# Altium PCB PitchShifter-PCB.PcbDoc (part 2 of 2)
Units mm, origin at the board's own origin, x right, y up, seen from the top; angles counter-clockwise.
Board outline 358.8 x 340 mm, 2 copper layers (Top Layer, Bottom Layer); 248 components, 206 nets, 919 pads, 27 vias.
Unrouted connection lines stored in the file: 494.
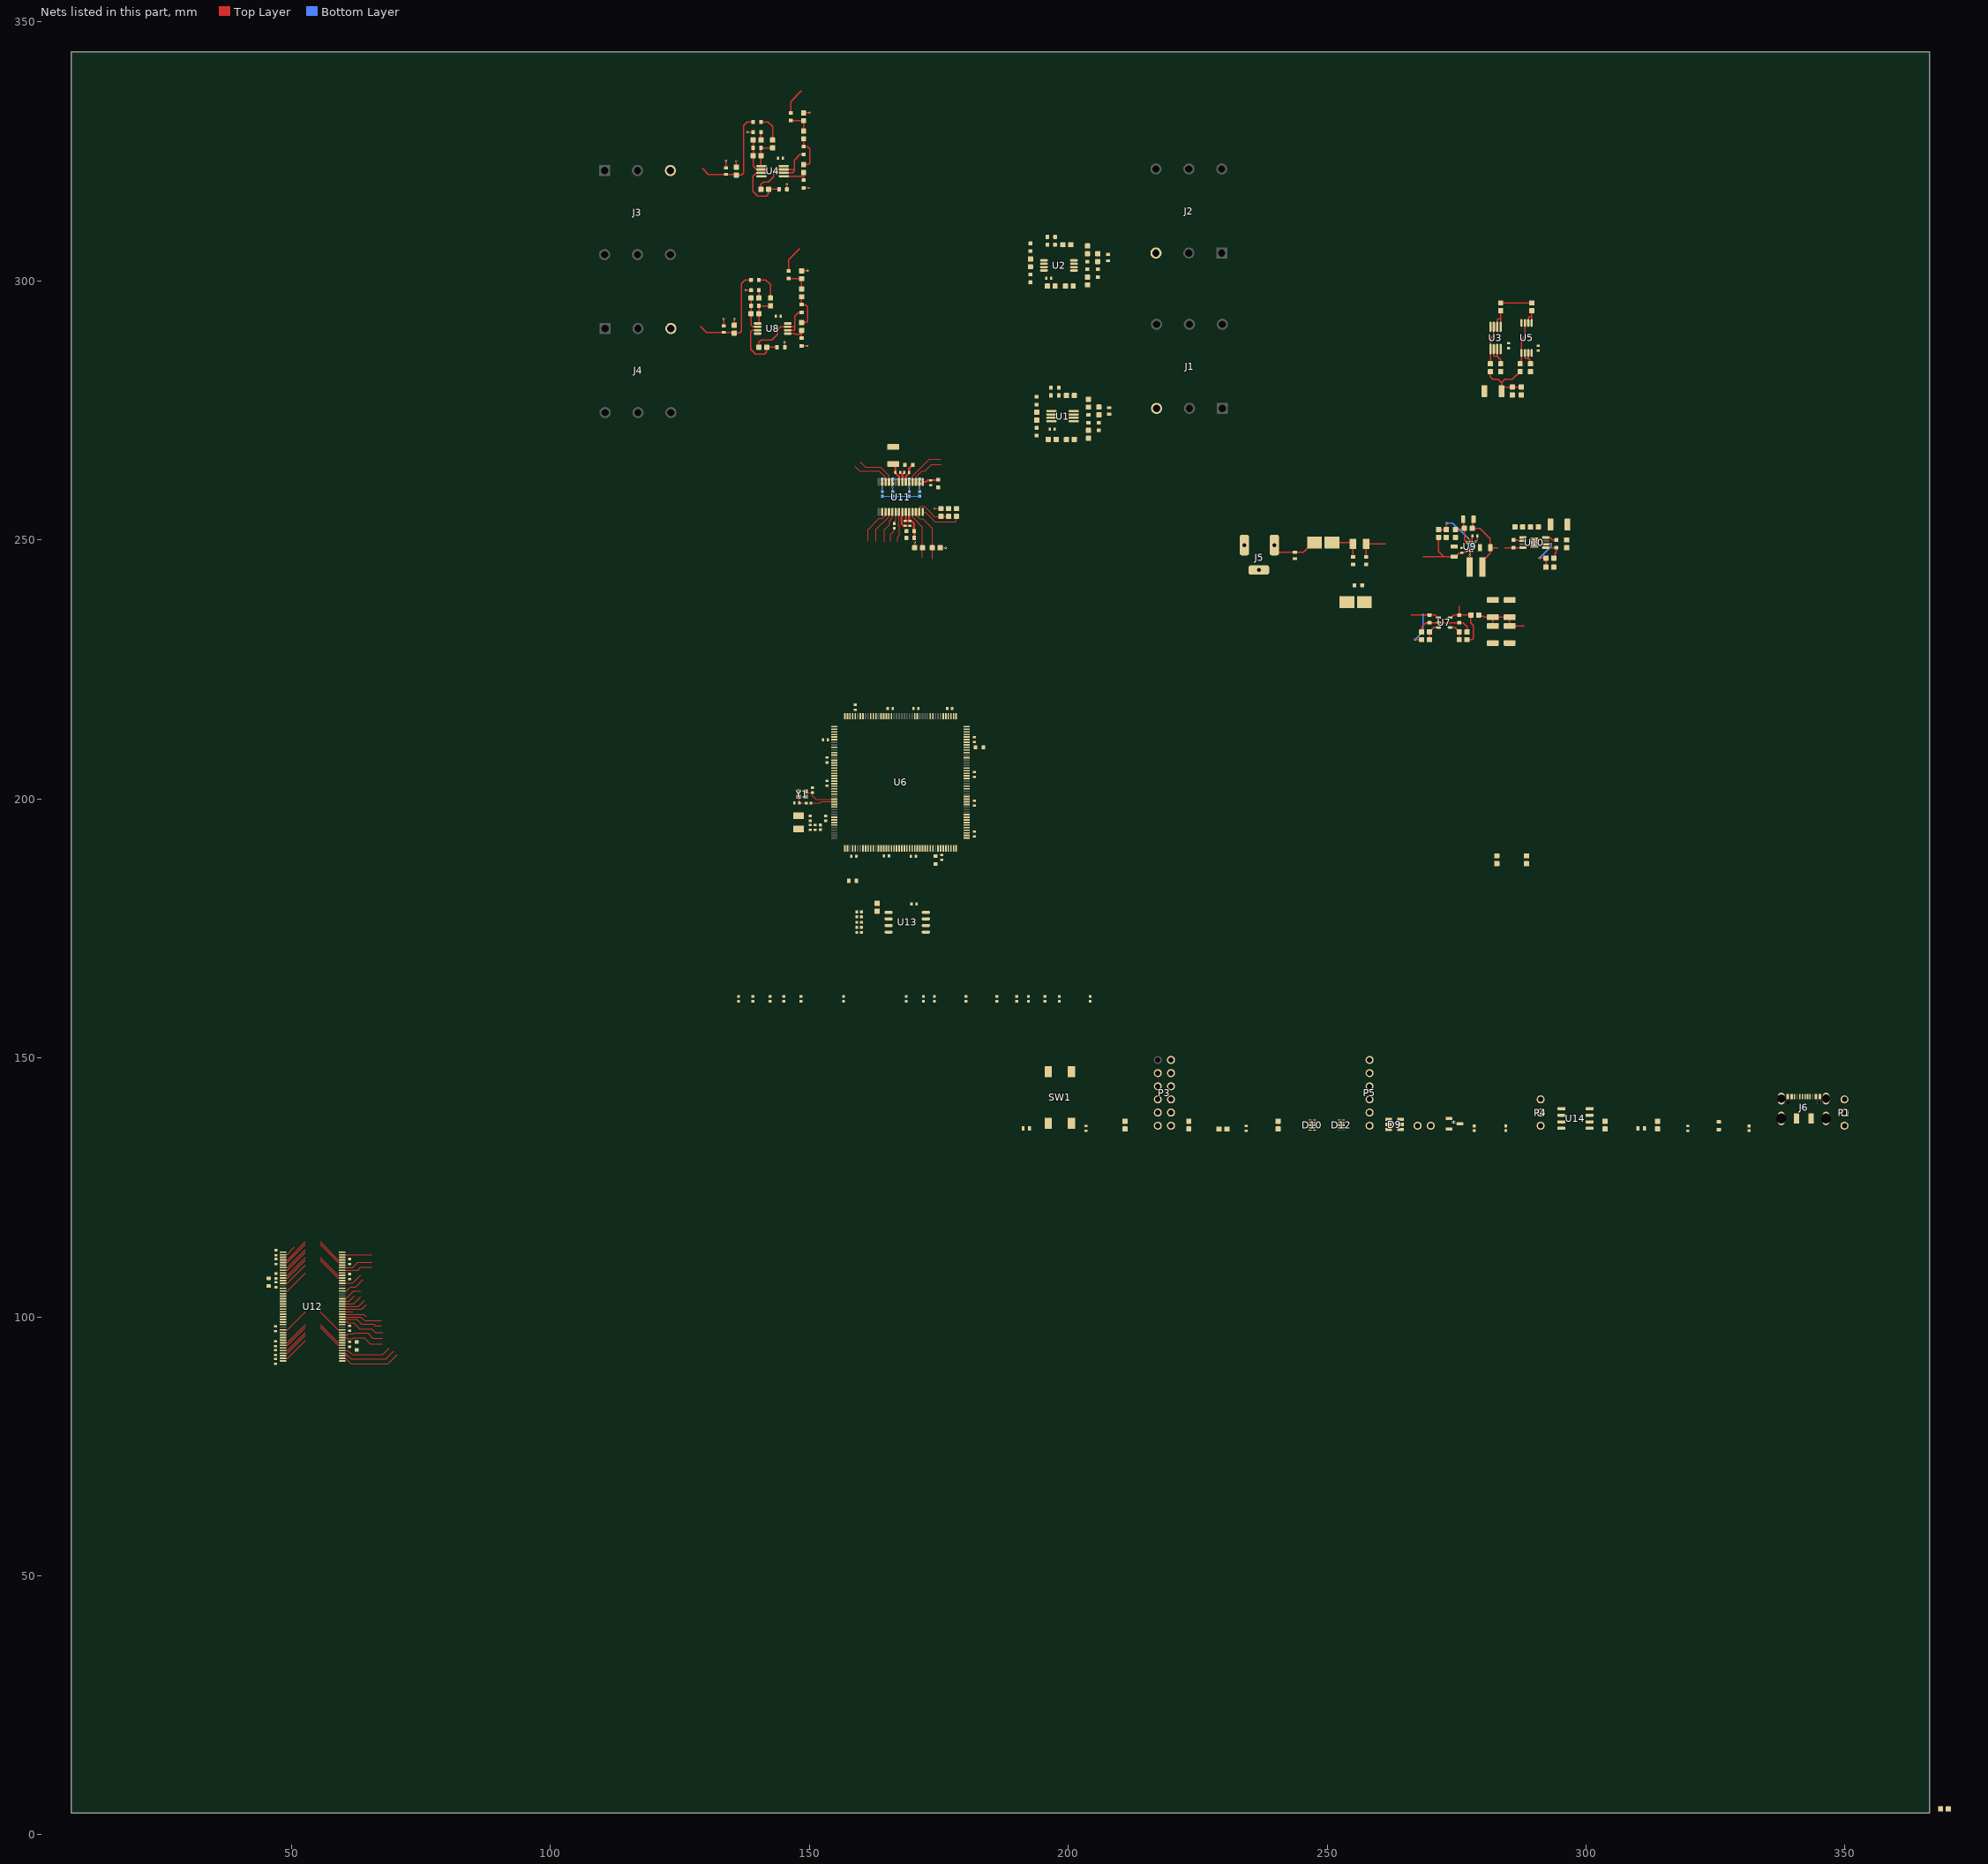
[diagram p2: the nets of this part, all layers, seen from the top]

## Part data
*: library part CMP-004-00034-1, "Automotive, dual, 3-pF, ±24-V, ±30-kV ESD protection diode for in-vehicle networks 3-SOT-23 -55 to 150", Case/Package=SOT-23, Manufacturer Lifecycle Status=ACTIVE, Height=1.22mm, Interface=CAN, Length=2.92mm, Lifecycle Status=Production, Pins=3, RoHS=Compliant, Thickness=1mm, Width=1.3mm
C1 C8 C15 C18 C26 C36 C37 C38 C39 C40 C41 C42 C43 C44 C45 C46 C47 C48 C49 C50 C53 C55 C56 C57 C67 C68 C69 C70 C71 C72 C73 C74 C75 C76 C77 C79 C82 C84 C95 C97 C99 C100 C103: library part CMP-001-00084-2, "MLCC 0402 50V / Samsung CL05B104KB54PNC"
C2 C6 C9 C13 C19 C24 C27 C32: library part CMP-001-00085-2, "MLCC 0603 50V / Samsung CL10C152JB8NNNC"
C3 C10 C17 C21 C22 C25 C29 C30 C33 C34 C35 C51 C52 C54 C66 C78 C86 C87 C92 C93 C98: library part CMP-001-00085-2, "Capacitor SMD Tantalum 0603 50V / Kyocera AVX F981C225MMA"
C4 C11: library part CMP-001-00085-2, "MLCC 0603 50V / TDK C1608C0G1H103JT000N"
C5 C7 C12 C14 C20 C23 C28 C31: library part CMP-001-00085-2, "MLCC 0603 50V / Samsung CL10C221JB8NNNC"
C16: library part CMP-001-00088-1, "MLCC 1210 10V / Samsung CL32A107MQVNNNE"
C58 C60 C63 C101: library part CMP-001-00085-2, "MLCC 0603"
C59 C61 C62 C64 C102: library part CMP-001-00084-2, "MLCC 0402"
C65 C88 C89 C90 C91 C94: library part CMP-001-00088-1, "1210, X5R:EIA, 100uF, DC6.3V, GRM32ER60J107ME20"
C80 C96: library part CMP-001-00084-2, "Capacitor, MLCC, 5.6pF, 50V, NPO, 5%, 0402, T=0,5mm"
C81 C83 C85: library part CMP-001-00086-2, "MLCC 0805"
D1 D2 D3 D4: library part CMP-12225-000013-1, "BORN 0603ESDA-05N Diode TVS / ESD Bidirectional 0603", Breakdown Voltage=6.4V, Clamping Voltage=10.2V, Manufacturer=STMicroelectronics, Manufacturer Part Number=ESDA7P60-1U1M, Max Junction Temp=+150°C, Package=1610, Peak Pulse Current=60A, Peak Pulse Power=700W, Reverse Standoff Voltage=5V, Temperature="-55°C to +150°C", Temperature Range Low=-55°C, Automotive=No, Category=Diode, ComponentLink2Description=Datasheet, ComponentLink2URL=http://www.st.com/content/ccc/resource/technical/document/datasheet/44/e9/26/44/42/ee/4f/e5/DM00139972.pdf/files/DM00139972.pdf/jcr:content/translations/en.DM00139972.pdf, Device Class L1="Circuit Protection", Device Class L2="TVS Diodes", Device Class L3=unset, Digikey Description="TVS DIODE 5V 11.6V 1610", Direction=Unidirectional, Height=0.65mm, Lead Free=Yes, Number Of Channels=1, Octopart=https://octopart.com/esda7p60-1u1m-stmicroelectronics-52112702, RoHS=TRUE, Standoff Height=0mm, Temperature Range High=+150°C
D5 D6: library part CMP-004-00006-2, "Nexperia BAT165AX / Rectifier Diode, Schottky, 1 Phase, 1 Element, 0.5A, 40V V(RRM), Silicon", Case/Package=SMB-2, Manufacturer=JCET, Package Description="2-Pin Surface Mount Device, Body 4.315 x 3.62 mm", Datasheet URL=http://wiki.seeedstudio.com/images/3/3f/0310130P1.pdf, Datasheet Version=May-13, Manufacturer URL=http://www.cj-elec.com/, Mounting Technology=SM, Package Reference=SMB-2, RoHS Compliant=Unknown
D7 D8: library part CMP-12225-000013-1, "Bourns CG0402MLU-12G  / ESD Protection Device, 25 V, 0402 [1005 Metric], 2 Pins, 12 V, 0.05 pF, ChipGuard MLU", Breakdown Voltage=6.4V, Clamping Voltage=10.2V, Manufacturer=STMicroelectronics, Manufacturer Part Number=ESDA7P60-1U1M, Max Junction Temp=+150°C, Package=1610, Peak Pulse Current=60A, Peak Pulse Power=700W, Reverse Standoff Voltage=5V, Temperature="-55°C to +150°C", Temperature Range Low=-55°C, Automotive=No, Category=Diode, ComponentLink2Description=Datasheet, ComponentLink2URL=http://www.st.com/content/ccc/resource/technical/document/datasheet/44/e9/26/44/42/ee/4f/e5/DM00139972.pdf/files/DM00139972.pdf/jcr:content/translations/en.DM00139972.pdf, Device Class L1="Circuit Protection", Device Class L2="TVS Diodes", Device Class L3=unset, Digikey Description="TVS DIODE 5V 11.6V 1610", Direction=Unidirectional, Height=0.65mm, Lead Free=Yes, Number Of Channels=1, Octopart=https://octopart.com/esda7p60-1u1m-stmicroelectronics-52112702, RoHS=TRUE, Standoff Height=0mm, Temperature Range High=+150°C
D9: library part CMP-004-00031-1, "STMicroelectronics Uni-Directional TVS Diode Array, 17V Vcl Max, SMD, SOT-23, 6V Vbr Min", Case/Package=SOT-23, Forward Voltage=1.1V, Max Operating Temperature=125°C, Min Operating Temperature=-40°C, Mounting Technology="Surface Mount", Pins=6
D10 D12: library part CMP-004-00032-3, "Tvs Diodes & Esd Suppressors; TPD4E02B04DQAR; Texas Instruments; 3.6 V; 8.8 V; 5.5 V; 6.4 V", Max Operating Temperature=125°C, Min Operating Temperature=-40°C, Mounting Technology="Surface Mount", Pins=10
D11: library part CMP-12225-000013-1, "Bourns CG0402MLU-3.3LG  / ESD Protection Device, 25 V, 0402 [1005 Metric], 2 Pins, 12 V, 0.05 pF, ChipGuard MLU", Breakdown Voltage=6.4V, Clamping Voltage=10.2V, Manufacturer=STMicroelectronics, Manufacturer Part Number=ESDA7P60-1U1M, Max Junction Temp=+150°C, Package=1610, Peak Pulse Current=60A, Peak Pulse Power=700W, Reverse Standoff Voltage=5V, Temperature="-55°C to +150°C", Temperature Range Low=-55°C, Automotive=No, Category=Diode, ComponentLink2Description=Datasheet, ComponentLink2URL=http://www.st.com/content/ccc/resource/technical/document/datasheet/44/e9/26/44/42/ee/4f/e5/DM00139972.pdf/files/DM00139972.pdf/jcr:content/translations/en.DM00139972.pdf, Device Class L1="Circuit Protection", Device Class L2="TVS Diodes", Device Class L3=unset, Digikey Description="TVS DIODE 5V 11.6V 1610", Direction=Unidirectional, Height=0.65mm, Lead Free=Yes, Number Of Channels=1, Octopart=https://octopart.com/esda7p60-1u1m-stmicroelectronics-52112702, RoHS=TRUE, Standoff Height=0mm, Temperature Range High=+150°C
FB1 FB2: library part CMP-06046-002300-1, "Ferrite Bead 3.6Ω @ 1MHz ±30% 2.55A 0.036Ω 1210 Embossed T/R"
J1 J2 J3 J4: library part CMP-78736-000004-1, "Conn 1/4\" Stereo Jack F 2 POS Solder ST Thru-Hole 6 Terminal 1 Port", Color=Black, Max Current Rating=3A, Max Operating Temperature=70°C, Min Operating Temperature=-25°C, Package Quantity=200, Voltage Rating=50V, Contact Material=Chrome, Contact Plating=Silver, Depth=18.2mm, Gender=Female, Housing Material=Polyamide, Mount="Through Hole", Number Of Contacts=2, Number of Pins=6, Number of Ports=1, Number of Terminals/Pins=6, Orientation=Horizontal, RoHS Compliant=Yes, Series=M, Termination="Through Hole", Weight=0.282192oz
J5: library part CMP-1502-00190-4, "DC Power Jack Connector WR-DC, Male, Right Angled, THT, 5 A, 24 V", Color=Black, Current Rating=5A, Flammability Rating="UL94 V-0", Insulation Resistance=100MΩ, Max Operating Temperature=85°C, Min Operating Temperature=-40°C, Operating Supply Voltage=24V, Voltage Rating=30V, Connector Type=Power, Contact Gender=Female, Contact Material="Gold, Tin", Contact Plating=Tin, Gender=Male, Height=11mm, Housing Material=Polyamide, Mount="Through Hole", Number Of Contacts=3, Packaging=Bulk, REACH SVHC=Unknown, RoHS=Compliant, Shielding=Unshielded, Termination="Through Hole"
J6: library part CMP-19038-000003-1, "CONN RCP USB2.0 TYP C 24P SMD RA"
L1: library part CMP-03913-148605656-1, "Power Inductor, 3.3UH, Shielded, 7.1A Rohs Compliant: Yes / Wurth 74439324033", ComponentLink1Description=Mauser, ComponentLink1URL=https://eu.mouser.com/en/ProductDetail/Wurth-Elektronik/74439324033?qs=HFfMDpzxxd18KH4wt4XmSg%3D%3D
P1 P4: library part CMP-002-00080-1, "Male Header, Pitch 2.54 mm, 1x3 Position, Height 8.636 mm, Tail Length 3.05 mm, -55 to 105 degC, RoHS, Bulk", Case/Package=2340-6111TG, Colour=Black, Current Rating=3A, Manufacturer=3M, Max Operating Temperature=105°C, Min Operating Temperature=-55°C, Package Description="Male Header, Pitch 2.54 mm, 1 x 40 Position, Height 8.636 mm, Tail Length 3.05 mm", Package Quantity=200, Connector Type=Header, Contact Finish=Gold, Contact Material=Copper, Contact Plating=Gold, Datasheet URL=https://datasheet.ciiva.com/5161/ts0766-242217-5161112.pdf, Datasheet Version=Aug-08, Gender=Male, Lead Pitch=0.1inch, Manufacturer URL=http://www.3m.com/, Max Current Rating=3A, Mounting Technology=TH, Package Reference=2340-6111TG, Packaging=Bulk, Pins=40, RoHS Compliant=True, Rows=1
P2: library part CMP-002-00078-1, "Male Header, Pitch 2.54 mm, 2x 1 Position, Height 8.636 mm, Tail Length 3.05 mm, -55 to 105 degC, RoHS, Bulk", Case/Package=2340-6111TG, Colour=Black, Current Rating=3A, Manufacturer=3M, Max Operating Temperature=105°C, Min Operating Temperature=-55°C, Package Description="Male Header, Pitch 2.54 mm, 1 x 40 Position, Height 8.636 mm, Tail Length 3.05 mm", Package Quantity=200, Connector Type=Header, Contact Finish=Gold, Contact Material=Copper, Contact Plating=Gold, Datasheet URL=https://datasheet.ciiva.com/5161/ts0766-242217-5161112.pdf, Datasheet Version=Aug-08, Gender=Male, Lead Pitch=0.1inch, Manufacturer URL=http://www.3m.com/, Max Current Rating=3A, Mounting Technology=TH, Package Reference=2340-6111TG, Packaging=Bulk, Pins=40, RoHS Compliant=True, Rows=1
P3: library part CMP-002-00077-1, "Male Header, Pitch 2.54 mm, 2x6 Position, Height 8.636 mm, Tail Length 3.05 mm, -55 to 105 degC, RoHS, Bulk", Case/Package=2340-6111TG, Colour=Black, Current Rating=3A, Manufacturer=3M, Max Operating Temperature=105°C, Min Operating Temperature=-55°C, Package Description="Male Header, Pitch 2.54 mm, 1 x 40 Position, Height 8.636 mm, Tail Length 3.05 mm", Package Quantity=200, Connector Type=Header, Contact Finish=Gold, Contact Material=Copper, Contact Plating=Gold, Datasheet URL=https://datasheet.ciiva.com/5161/ts0766-242217-5161112.pdf, Datasheet Version=Aug-08, Gender=Male, Lead Pitch=0.1inch, Manufacturer URL=http://www.3m.com/, Max Current Rating=3A, Mounting Technology=TH, Package Reference=2340-6111TG, Packaging=Bulk, Pins=40, RoHS Compliant=True, Rows=1
P5: library part CMP-002-00079-1, "Male Header, Pitch 2.54 mm, 1x6 Position, Height 8.636 mm, Tail Length 3.05 mm, -55 to 105 degC, RoHS, Bulk", Case/Package=2340-6111TG, Colour=Black, Current Rating=3A, Manufacturer=3M, Max Operating Temperature=105°C, Min Operating Temperature=-55°C, Package Description="Male Header, Pitch 2.54 mm, 1 x 40 Position, Height 8.636 mm, Tail Length 3.05 mm", Package Quantity=200, Connector Type=Header, Contact Finish=Gold, Contact Material=Copper, Contact Plating=Gold, Datasheet URL=https://datasheet.ciiva.com/5161/ts0766-242217-5161112.pdf, Datasheet Version=Aug-08, Gender=Male, Lead Pitch=0.1inch, Manufacturer URL=http://www.3m.com/, Max Current Rating=3A, Mounting Technology=TH, Package Reference=2340-6111TG, Packaging=Bulk, Pins=40, RoHS Compliant=True, Rows=1
R1 R3 R4 R5 R8 R10 R11 R12 R15 R16 R17 R18 R20 R21 R22 R24 R25 R26 R28 R29 R30 R32 R76 R77: library part CMP-009-00177-7, "Chip THIN FILM 0603 / Viking Tech ARG03FTC5101"
R2 R7 R9 R14 R19 R27: library part CMP-009-00177-7, "Chip THIN FILM 0603 / Viking Tech AR03FTC1004"
R6 R13 R23 R31: library part CMP-009-00177-7, "Chip THIN FILM 0603 / Resistor.Today HPCR0603F68R0K9"
R33 R34 R52 R53 R54 R55 R56 R57 R58: library part CMP-009-00177-7, "Chip 0603"
R35 R40 R41 R59 R60 R61 R62 R63 R64 R65 R66 R67 R68 R69 R70 R71 R75 R78 R79 R82 R83 R84 R85 R86 R87 R90 R91 R94 R95 R96 R97 R98 R99 R100 R101: library part CMP-009-00178-3, "Chip 0402 resistor"
R36 R37 R38 R39 R42 R43 R44 R45 R46 R47 R48 R49 R50 R51 R72 R73 R74 R80 R81 R88 R89 R92 R93 R?: library part CMP-009-00177-7, "Chip resistor 0603"
SW1: library part CMP-00030-00001-1, "Switch Tactile N.O. SPST Round Button Gull Wing 0.05A 12VDC >100000Cycles 1.6N SMD T/R", Case/Package=SMD/SMT, Max Operating Temperature=70°C, Min Operating Temperature=-20°C, Mounting Technology="Surface Mount"
U1 U3 U4: library part CMP-0187-00576-3, "None", Case/Package=MSOP, Input Bias Current=1pA, Input Offset Voltage (Vos)=4.5mV, Max Operating Temperature=125°C, Max Supply Voltage=6V, Min Operating Temperature=-40°C, Min Supply Voltage=1.8V, Nominal Supply Current=100uA, Operating Supply Voltage=5.5V, Output Current=23mA, Package Quantity=100, Power Supply Rejection Ratio (PSRR)=86dB, Voltage Gain=112dB, Amplifier Type="GENERAL PURPOSE", Bandwidth=1MHz, Common Mode Rejection Ratio=60dB, Gain Bandwidth Product=1MHz, Height=0.95mm, Input Offset Voltage-Max=4.5mV, Lead Free="Lead Free", Length=3mm, Mount="Surface Mount", Number of Amplifiers=2, Number Of Channels=2, Number of Circuits=2, Number of Elements=2, Number of Pins=8, Packaging=Rail/Tube, Radiation Hardening=No, REACH SVHC="No SVHC", RoHS Compliant=Yes, Slew Rate=0.6V/µs, Slew Rate-Nom=0.6V/µs, Supply Current=100uA, Technology=CMOS, Unity Gain Bandwidth Product=1MHz, Width=3mm
U2 U5 U8: library part CMP-014-00002-2, "Dual, 5.5-V, 10-MHz operational amplifier 8-TSSOP -40 to 125", Case/Package=TSSOP, Manufacturer Lifecycle Status=ACTIVE, Max Operating Temperature=125°C, Min Operating Temperature=-40°C, Bandwidth=10MHz, Height=1.2mm, Length=3mm, Lifecycle Status=Production, Number Of Channels=2, PartId=1, Pins=8, RoHS=Compliant, Slew Rate=6.5V/µs, Thickness=1mm, Width=4.4mm
U6: library part CMP-12105-000078-1, "IC MCU 32BIT 2MB FLASH 176LQFP", Ambient Temperature Range High=+85°C, Ambient Temperature Range Low=-40°C, Frequency=400MHz, Manufacturer=STMicroelectronics, Max Junction Temp=+125°C, Max Supply Voltage=3.6V, Min Supply Voltage=1.62V, Package=LQFP176-1T, Temperature="-40°C to +125°C", Automotive=No, Category=IC, ComponentLink2Description=Datasheet, ComponentLink2URL=https://www.st.com/resource/en/datasheet/stm32h743ii.pdf, Core Architecture="ARM Cortex-M7", Data Bus Width=32bits, Device Class L1="Integrated Circuits (ICs)", Device Class L2="Embedded Processors and Controllers", Device Class L3=Microcontrollers, Digikey Description="IC MCU 32BIT 2MB FLASH 176LQFP", Height=1.6mm, Interface=I2C,SPI,UART,USART,CAN,USB,LIN,IrDA,Ethernet,SMBus,Other, Ipc Land Pattern Name=QFP50P2600X2600X160-176, Lead Free=Yes, Manufacturer Part Number=STM32H743IIT6, Memory Size=2MBytes, Memory Type=FLASH, Mouser Description="MCU 32-Bit STM32 ARM Cortex M7 RISC 2MB Flash 1.8V/2.5V/3.3V 176-Pin LQFP Tray", Number Of A/D Converters=3, Number Of Adc Channels=36, Number Of Cores=1, Number Of Ethernet Channels=1, Number Of I2C Channels=4, Number Of I/Os=140, Number Of Pwm Channels=2, Number Of Spi Channels=6, Number Of Timers/Counters=20, Number Of Uart Channels=9, Number Of Usb Channels=2, Octopart=https://octopart.com/stm32h743iit6-stmicroelectronics-76372526, Ram Size=1MBytes, RoHS=TRUE, Standoff Height=0.05mm, Temperature Range High=+125°C, Temperature Range Low=-40°C
U7: library part CMP-07128-000004-1, "300 MA LOW IQ WIDE INPUT", Dropout Voltage=480mV, Manufacturer="On Semiconductor", Max Junction Temp=+125°C, Max Supply Voltage=24V, Min Supply Voltage=2.5V, Nominal Supply Current=50-300uA, Output Current=300mA, Output Voltage=1.2-5V, Package=419AE-01, Temperature="to +125°C", Accuracy Percentage=2%, Automotive=No, Category=IC, ComponentLink2Description=Datasheet, ComponentLink2URL=https://www.onsemi.com/pub/Collateral/NCP718-D.PDF, ComponentLink3Description=Mauser, ComponentLink3URL=https://eu.mouser.com/en/ProductDetail/onsemi/NCP718BSNADJT1G?qs=MLItCLRbWszq%252BMkbDp%2FijQ%3D%3D, Device Class L1="Integrated Circuits (ICs)", Device Class L2="Power Management ICs", Device Class L3="Voltage Regulators - Linear", Digikey Description="300 MA LOW IQ WIDE INPUT", Height=1mm, Lead Free=Yes, Manufacturer Part Number=NCP718BSNADJT1G, Mouser Description="LDO Regulator, 300 mA, Wide Vin, Ultra-Low Iq Adjustable, Non-Active Discharge, TSOT23-5", Number Of Outputs=1, Octopart=https://octopart.com/ncp718bsnadjt1g-on+semiconductor-87658781, Output Type=AdjustableProgrammable, RoHS=TRUE, Standoff Height=0.01mm, Temperature Range High=+125°C
U9: library part CMP-019-00067-2, "4.2V to 17V input voltage, 2A, 1.2MHz synchronous buck converter in SOT563 with Eco-mode 6-SOT-5X3 -40 to 125", Manufacturer Lifecycle Status=ACTIVE, Height=600µm, Length=1.6mm, Lifecycle Status=Production, Pins=6, RoHS=Compliant, Thickness=550µm, Topology=Buck, Width=1.2mm
U10: library part CMP-019-00068-2, "Adjustable- and fixed-output, 1-A, 16-V, positive-voltage low-dropout (LDO) linear regulator", Manufacturer Lifecycle Status=ACTIVE, Output Voltage=1.8V, Height=1.1mm, Length=3mm, Lifecycle Status=Production, Number Of Channels=1, Pins=8, RoHS=Compliant, Thickness=1.02mm, Width=3mm
U11: library part CMP-015-00011-3, "PCM Audio Codec, 2ADC/2DAC Ch, Automotive, 28-Pin TSSOP Tube", Case/Package=TSSOP, Max Operating Temperature=85°C, Max Supply Current=53mA, Max Supply Voltage=5.25V, Min Operating Temperature=-40°C, Min Supply Voltage=4.75V, Nominal Supply Current=45mA, Temperature Grade=Industrial, Contact Plating=Tin, Height - Seated (Max)=1.2mm, Interface="I2C, SPI", Introduction Date=2003-01-21, Length=9.7mm, Lifecycle Status=Obsolete, LTB Date=2021-04-19, LTD Date=2021-04-19, Mounting Technology="Surface Mount", Number Of A/D Converters=2, Number of Bits=24, Number Of Channels=2, Number of Circuits=1, Number of D/A Converters=2, Number of Terminals=28, Pins=28, REACH SVHC=Unaffected, Resolution=3B, RoHS=Compliant, Sampling Rate=192ksps, Signal to Noise Ratio (SNR)=114dB, Terminal Pitch=650µm, Termination=SMD/SMT, Type="General Purpose", Width=4.4mm
U12: library part CMP-019-00064-5, "128M, 3.3V, Sdram, 4Mx32, 166Mhz, 86 Pin;", Max Operating Temperature=70°C, Max Supply Voltage=3.6V, Min Operating Temperature=0°C, Min Supply Voltage=3V, Nominal Supply Voltage (DC)=3.3V, Temperature Grade=Commercial, Access Time=5.4ns, China RoHS=Compliant, Country of Origin="Mainland China, Taiwan", Export Control Classification Number (ECCN) Code=EAR99, Harmonized Tariff Schedule (HTS) Code=8542.32.00.02, Height - Seated (Max)=1.2mm, Introduction Date=2017-05-09, Length=22.22mm, Lifecycle Status=Production, Number of Circuits=1, Number of Ports=1, Number of Terminals=86, REACH SVHC=Unaffected, RoHS=Compliant, Terminal Pitch=500µm, Width=10.16mm
U13: library part CMP-019-00065-3, "NOR Flash Serial (SPI, Dual SPI, Quad SPI) 1.8V 128M-bit 16M x 8 8-Pin SOIC Bulk", Case/Package=SOP, Max Operating Temperature=85°C, Max Supply Current=20mA, Max Supply Voltage=1.95V, Min Operating Temperature=-40°C, Min Supply Voltage=1.7V, Nominal Supply Voltage (DC)=1.8V, Temperature Grade=Industrial, China RoHS=Compliant, Country of Origin=Taiwan, Export Control Classification Number (ECCN) Code=EAR99, Harmonized Tariff Schedule (HTS) Code=8542.32.00.51, Height - Seated (Max)=2.16mm, Introduction Date=2019-05-23, Length=5.28mm, Lifecycle Status=Production, Memory Format=FLASH, Number of Circuits=1, Number of Terminals=8, REACH SVHC=Unaffected, RoHS=Compliant, Schedule B=8542320070, Terminal Pitch=1.27mm, Width=5.28mm
U14: library part CMP-015-00010-2, "Automotive 3.3V CAN flexible-data-rate (FD) transceiver with shutdown and standby mode 8-SOIC -40 to 150", Case/Package=SOIC, Manufacturer Lifecycle Status=ACTIVE, Height=1.75mm, Length=4.9mm, Lifecycle Status=Production, Pins=8, RoHS=Compliant, Thickness=1.58mm, Width=3.91mm
Y1: library part CMP-200220-000017-1, "NX2016SA 25MHz / Crystal 25MHz, 6pF, +-20ppm, 80ohms max, SMD", Case/Package=SMD/SMT, ESR (Equivalent Series Resistance)=60R, Frequency=32MHz, Load Capacitance=8pF, Max Operating Temperature=125°C, Min Operating Temperature=-40°C, Ratings=AEC-Q200, Mount="Surface Mount", Packaging="Tape and Reel"

## Via types
v1: diameter 0.4, hole 0.2, Top Layer to Bottom Layer, 27 vias

## Nets (pads, with @x,y where several pads share a name; then routed paths per layer and width w, separated by ;. In a path a pad name is that pad's centre, name@x,y a point inside that pad or via, vN(x,y) a via of type N, cw(c..) or ccw(c..) an arc to the next point about the centre after c; other vN are vias at no path point)
+3V3: C35.1 C36.2 C37.2 C38.2 C39.2 C40.2 C41.2 C42.2 C43.1 C44.1 C45.1 C46.1 C47.1 C48.1 C55.1 C56.1 C57.1 C60.1 C61.1 C66.1 C67.1 C68.1 C69.1 C70.1 C71.1 C72.1 C73.1 C74.1 C75.1 C76.1 C77.1 C78.1 C79.1 C93.1 C97.1 C98.1 C101.1 C102.1 C103.1 D11.1 FB2.1 P3.8 P3.9 R34.2 R47.1 R49.2 R72.2 R73.2 R88.1 U6.15 U6.23 U6.36 U6.49 U6.62 U6.72 U6.82 U6.91 U6.103 U6.114 U6.127 U6.136 U6.149 U6.159 U6.172 U10.1 U11.9 U11.10 U12.1 U12.3 U12.9 U12.15 U12.29 U12.35 U12.41 U12.43 U12.49 U12.55 U12.75 U12.81 U13.8 U14.3 | length 14.6
  Top Layer w0.15: R72.2@170.345,248.5 v1(170.345,249.545) ; R73.2@175.255,248.5 v1(176.3,248.5)
  Top Layer w0.254: U10.1@292.2,248.525 292.213,248.513 294.238,248.513 C93.1@294.25,248.5 294.25,247.636 294,247.386 294,246.745 R49.2@293.755,246.5
  Top Layer w0.4: U11.9@168.625,255.4 168.625,253.725 168.575,253.675 C102.1@168.5,253.675 169.725,253.675 170.2,253.2 170.2,251.75 C60.1@170.25,251.7 C101.1@170.25,250.4 ; U11.10@169.275,255.4 169.275,253.725 C61.1@169.325,253.675
+3V3A: C94.2 R47.2
+4V: C83.1 C85.1 C92.1 L1.2 R37.1 R48.1 U10.8 | length 17.5
  Top Layer w0.254: C85.1@278.25,254 278.128,253.878 278.128,252.373 R37.1@278.005,252.25 279.5,252.25 281.5,250.25 C83.1@281.5,248.5 ; L1.2@279.975,244.75 279.975,246.05 280.448,246.523 280.604,246.523 281.5,247.419 C83.1@281.5,248.5 ; 283,248.5 C83.1@281.5,248.5 ; 284.25,248.5 C92.1@286,248.5 286.012,248.513 287.787,248.513 U10.8@287.8,248.525
+5V: C87.1 R42.1 R43.1 U7.5 | length 12
  Top Layer w0.254: U7.5@273.731,235 273.958,235 274.458,235.5 C87.1@275.5,235.5 ; 275.5,237.25 C87.1@275.5,235.5 ; R43.1@277.005,230.75 278,230.75 278.25,231 278.25,233.5 277.745,234.005 R42.1@277.745,235.5 C87.1@275.5,235.5
+5VA: C1.1 C8.1 C15.1 C18.1 C26.1 C58.1 C59.1 C88.2 C89.2 C90.2 C91.2 C95.1 R15.2 R42.2 R74.2 U1.8 U2.8 U3.8 U4.8 U5.8 U8.8 U11.20 | length 17.5
  Top Layer w0.15: v1(174.155,256.055) R74.2@175.4,256.055
  Top Layer w0.254: R42.2@279.255,235.5 279.48,235.275 280.141,235.275 280.316,235.1 C90.2@282,235.1 ; C88.2@282,233.4 C90.2@282,235.1 ; 288,233.5 287.9,233.4 C89.2@285.25,233.4 C91.2@285.25,235.1 C90.2@282,235.1
  Top Layer w0.4: U11.20@168.625,261.2 168.65,261.225 168.65,262.3 169.275,262.925 C59.1@169.275,263 169.275,263.825 169.75,264.3 169.8,264.3 169.95,264.45 C58.1@169.95,264.5
+V_USB: D5.1 D8.1 D9.5 J6.A4/B9 J6.B4/A9
+VBL: C17.1 R1.1 R2.2 R19.2 R33.2 R52.1 R54.1 | length 8.2
  Top Layer w0.254: v1(138.1,328.7) C17.1@139.15,328.7 ; R19.2@148.9,332.455 v1(150.045,332.455) ; R52.1@283.5,295.755 R54.1@289.5,295.755
+VBR: C25.1 R8.1 R9.2 R27.2 R56.1 R57.1 R58.2 | length 2.2
  Top Layer w0.254: v1(137.7,298.2) C25.1@138.75,298.2 ; R27.2@148.5,301.955 v1(149.645,301.955)
+VBUS: C54.1 D5.2 R80.1 R?.2
+VCC: D6.1 D7.1 J5.1 | length 9.5
  Top Layer w0.254: J5.1@239.8,249 239.8,248.373 240.548,247.625 D7.1@243.75,247.625 245.4,247.625 247.275,249.5 D6.1@247.575,249.5
+VCC_FILT: C34.1 C81.2 C82.1 C86.1 FB1.2 R36.1 R45.1 R?.1 U7.1 U9.1 | length 31.1
  Top Layer w0.254: C34.1@257.5,246.75 257.5,249.225 FB1.2@257.525,249.25 261.25,249.25 ; 266.25,235.5 v1(268.5,235.5) C86.1@269.75,235.5 270.773,235.5 271.273,235 U7.1@271.5,235 ; v1(267,230.75) R45.1@268.245,230.75 ; 268.5,246.75 272.5,246.75 ; R36.1@271.5,250.495 271.5,247.75 272.5,246.75 ; 276.75,247.75 276.623,247.623 276.098,247.623 C82.1@276,247.525 275.902,247.427 275.477,247.427 274.8,246.75 C81.2@274.5,246.75 272.5,246.75
  Bottom Layer w0.254: v1(267,230.75) 268.5,232.25 v1(268.5,235.5)
+VCC_RP: C33.1 D6.2 FB1.1 | length 6.7
  Top Layer w0.254: D6.2@250.925,249.5 254.725,249.5 FB1.1@254.975,249.25 255,249.225 C33.1@255,246.75
AUDIOL_IN: D1.1 J1.3 R6.1
AUDIOL_OUT: C22.2 D3.1 J3.3 R24.2 | length 19.9
  Top Layer w0.254: 129.4,321.7 130.525,320.575 D3.1@133.9,320.575 133.965,320.51 135.835,320.51 R24.2@135.9,320.445 136.945,320.445 137.3,320.8 137.3,330 138,330.7 C22.2@139.15,330.7
AUDIOR_IN: D2.1 J2.3 R13.1
AUDIOR_OUT: C30.2 D4.1 J4.3 R32.2 | length 19.9
  Top Layer w0.254: 129,291.2 130.125,290.075 D4.1@133.5,290.075 133.565,290.01 135.435,290.01 R32.2@135.5,289.945 136.545,289.945 136.9,290.3 136.9,299.5 137.6,300.2 C30.2@138.75,300.2
BOOT0: D12.4 D12.7 P3.7 R89.1 U6.166
BUCK_BST: C84.2 U9.4 | length 1.3
  Top Layer w0.254: U9.4@278,249.49 278.009,249.499 278.009,250.734 C84.2@278.025,250.75
BUCK_EN: R36.2 R38.1 U9.5 | length 9.1
  Top Layer w0.254: R36.2@271.5,252.005 R38.1@273,252.005 v1(273,253.25) ; v1(277.25,250.25) 277.5,250 U9.5@277.5,249.49
  Bottom Layer w0.254: v1(273,253.25) 274.25,253.25 v1(277.25,250.25)
BUCK_FB: C85.2 R37.2 R39.1 U9.6 | length 6.7
  Top Layer w0.254: R39.1@274.75,252.005 274.873,252.127 276.373,252.127 R37.2@276.495,252.25 ; C85.2@276.25,254 276.373,253.877 276.373,252.373 R37.2@276.495,252.25 ; U9.6@277,249.49 276.495,249.995 R37.2@276.495,252.25
BUCK_SW: C84.1 L1.1 U9.2 | length 7.6
  Top Layer w0.254: U9.2@277.5,248.01 v1(277.5,247) 277.5,244.775 L1.1@277.525,244.75 ; v1(278.75,249.75) 278.975,249.975 C84.1@278.975,250.75
  Bottom Layer w0.254: v1(277.5,247) 277.5,248.5 v1(278.75,249.75)
CAN_H: *.1 R79.2 U14.7
CAN_L: *.2 P2.1 U14.6
CAN_RX: R78.2 U14.4
CAN_SHDN: R67.1 U14.5
CAN_STB: U14.8
CAN_TX: R65.1 R69.1 U14.1
CODEC_ADDR: R74.1 R93.2 U11.13 | length 7.3
  Top Layer w0.15: U11.13@171.225,255.4 171.225,256.237 171.488,256.5 172.2,256.5 173.1,255.6 174.155,254.545 175.3,254.545 R74.1@175.4,254.545 176,254.545 R93.2@176.8,254.545
CODEC_AINA-: R94.1 R101.1 U11.16 | length 2.6
  Top Layer w0.15: v1@171.237,260.113 U11.16@171.237,261.188
  Bottom Layer w0.15: R101.1@171.3,259.35 171.275,259.375 171.275,260.075 v1(171.25,260.1) 171.275,260.125 171.275,260.825 R94.1@171.3,260.85
CODEC_AINB-: R95.1 R100.1 U11.19 | length 2.6
  Top Layer w0.15: U11.19@169.275,261.2 169.287,261.188 169.287,260.113 v1(169.3,260.1)
  Bottom Layer w0.15: R100.1@169.3,259.35 v1(169.3,260.1) R95.1@169.3,260.85
CODEC_AOUTA-: R96.1 R99.1 U11.24 | length 2.6
  Top Layer w0.15: v1@166.037,260.113 U11.24@166.037,261.188
  Bottom Layer w0.15: R99.1@166.1,259.35 166.075,259.375 166.075,260.075 v1(166.05,260.1) 166.075,260.125 166.075,260.825 R96.1@166.1,260.85
CODEC_AOUTB-: R97.1 R98.1 U11.27 | length 2.6
  Top Layer w0.15: v1@164.088,260.113 U11.27@164.088,261.188
  Bottom Layer w0.15: R98.1@164.1,259.35 v1(164.1,260.1) R97.1@164.1,260.85
CODEC_DOUT: R60.2 U11.6 | length 2.4
  Top Layer w0.15: R60.2@166.4,253.15 166.429,253.179 166.429,253.562 166.675,253.808 U11.6@166.675,255.4
CODEC_FILT+: C64.1 C65.2 U11.22 | length 4
  Top Layer w0.4: C65.2@166.2,264.65 166.275,264.65 166.625,264.3 C64.1@166.625,263 166.625,262.925 167.3,262.25 167.3,261.225 U11.22@167.325,261.2
CODEC_IN_L: C3.1 U11.17 | length 6.9
  Top Layer w0.15: U11.17@170.575,261.2 170.587,261.212 170.587,262.2 171.687,263.3 172.3,263.3 173.6,264.6 175.5,264.6
CODEC_IN_R: C10.1 U11.18 | length 7.9
  Top Layer w0.15: U11.18@169.925,261.2 169.925,262.371 173.154,265.6 175.294,265.6
CODEC_OUT_L: C21.2 U11.25 | length 13
  Top Layer w0.15: 159.8,265.1 160.8,264.1 163.7,264.1 165.375,262.425 U11.25@165.375,261.2
  Top Layer w0.254: C21.2@146.4,332.45 146.4,334.6 148.5,336.7
CODEC_OUT_R: C29.2 U11.26 | length 12.8
  Top Layer w0.15: 158.8,264.2 159.7,263.3 163.5,263.3 164.629,262.171 164.629,261.296 U11.26@164.725,261.2
  Top Layer w0.254: C29.2@146,301.95 146,304.1 148.1,306.2
CODEC_RST: R59.2 R92.2 U11.14 | length 8.8
  Top Layer w0.15: U11.14@171.875,254.875 U11.14@171.875,255.4 172.4,255.4 174.3,253.5 178.2,253.5 178.4,253.7 R92.2@178.4,254.545
FDCAN2_RX: R78.1 U6.92
FDCAN2_SHDN: R67.2 U6.94
FDCAN2_STB: R69.2 U6.95
FDCAN2_TX: R65.2 U6.93
GND: *.3 C1.2 C5.1 C6.2 C7.1 C8.2 C12.1 C13.2 C14.1 C15.2 C16.2 C18.2 C23.1 C24.1 C26.2 C31.1 C32.1 C33.2 C34.2 C35.2 C36.1 C37.1 C38.1 C39.1 C40.1 C41.1 C42.1 C43.2 C44.2 C45.2 C46.2 C47.2 C48.2 C49.2 C50.2 C51.2 C52.2 C53.2 C54.2 C55.2 C56.2 C57.2 C58.2 C59.2 C60.2 C61.2 C62.2 C63.2 C64.2 C65.1 C66.2 C67.2 C68.2 C69.2 C70.2 C71.2 C72.2 C73.2 C74.2 C75.2 C76.2 C77.2 C78.2 C79.2 C80.2 C81.1 C82.2 C83.2 C86.2 C87.2 C88.1 C89.1 C90.1 C91.1 C92.2 C93.2 C94.1 C95.2 C96.1 C97.2 C98.2 C99.2 C100.2 C101.2 C102.2 C103.2 D1.2 D2.2 D3.2 D4.2 D7.2 D8.2 D9.2 D10.3 D10.8 D11.2 D12.3 D12.8 J5.2 J5.3 J6.1 J6.2 J6.3 J6.4 J6.5 J6.6 J6.A1/B12 J6.A12/B1 P1.2 P3.10 P3.11 P4.2 P5.6 R7.1 R14.1 R16.1 R24.1 R32.1 R38.2 R39.2 R44.2 R46.2 R50.2 R51.1 R76.2 R77.2 R81.2 R89.2 R92.1 R93.1 R98.2 R99.2 R100.2 R101.2 SW1.3 SW1.4 U1.4 U2.4 U3.4 U4.4 U5.4 U6.14 U6.22 U6.37 U6.48 U6.61 U6.71 U6.90 U6.102 U6.113 U6.126 U6.135 U6.148 U6.158 U7.2 U8.4 U9.3 U10.4 U10.6 U10.9 U11.2 U11.8 U11.21 U12.6 U12.12 U12.32 U12.38 U12.44 U12.46 U12.52 U12.58 U12.72 U12.78 U12.84 U12.86 U13.4 U14.2 Y1.2 Y1.4 | length 38.7
  Top Layer w0.254: D4.2@133.5,291.325 v1(133.5,292.7) ; D3.2@133.9,321.825 v1(133.9,323.2) ; R32.1@135.5,291.455 v1(135.5,292.7) ; R24.1@135.9,321.955 v1(135.9,323.2) ; C31.1@145.25,287.2 v1(145.25,288.15) ; C23.1@145.65,317.7 v1(145.65,318.65) ; C32.1@148.5,287.45 v1(149.55,287.45) ; C24.1@148.9,317.95 v1(149.95,317.95) ; R46.2@268.245,232.25 268.245,233.245 269,234 C86.2@269.75,234 269.775,234.025 271.475,234.025 U7.2@271.5,234.05 271.525,234.025 275.475,234.025 C87.2@275.5,234 275.531,233.969 276.281,233.969 277.005,233.245 R44.2@277.005,232.25 ; C92.2@286,250 286.781,250 286.912,249.869 287.756,249.869 U10.6@287.8,249.825 ; U10.4@292.2,250.475 292.244,250.431 293.038,250.431 293.469,250 C93.2@294.25,250
  Top Layer w0.4: C64.2@167.575,263 167.575,262.925 167.6,262.9 167.625,262.9 167.975,262.55 ; U11.8@167.975,255.4 167.95,255.375 167.95,254.601 167.806,254.457 167.806,253.077 168.133,252.75 168.475,252.75 C102.2@168.5,252.725 C61.2@169.4,252.725 ; U11.21@167.975,261.2 167.975,262.55 ; C59.2@168.325,263 168.325,262.925 167.975,262.575 167.975,262.55
  Bottom Layer w0.15: R98.2@164.1,258.45 R99.2@166.1,258.45 R100.2@169.3,258.45 R101.2@171.3,258.45
I2C1_SCL: R61.1 R72.1 U11.11 | length 9.7
  Top Layer w0.15: U11.11@169.925,255.4 169.925,254.439 171.855,252.509 R72.1@171.855,248.5 171.855,246.5
I2C1_SDA: R63.1 R73.1 U11.12 | length 10.7
  Top Layer w0.15: U11.12@170.575,255.4 170.575,254.865 171.34,254.1 171.9,254.1 173.745,252.255 R73.1@173.745,248.5 173.745,246.355
I2C2_SCL: P4.1 R90.1
I2C2_SDA: P4.3 R91.1
INL_ADC_CAP: C3.2 C5.2 R3.1
INL_BUF: C4.1 R2.1 U1.3
INL_BUF_OUT: R4.2 U1.1 U1.2
INL_FILT_OUT: C2.1 R3.2 U1.6 U1.7
INL_FILT_RC1: C2.2 R1.2 R4.1 R5.1
INL_FILT_RC2: C6.1 R5.2 U1.5
INL_RF: C4.2 C7.2 R6.2 R7.2
INR_ADC_CAP: C10.2 C12.2 R10.1
INR_BUF: C11.1 R9.1 U2.3
INR_FILT_OUT: C9.1 R10.2 U2.6 U2.7
INR_FILT_RC1: C9.2 R8.2 R11.1 R12.1
INR_FILT_RC2: C13.1 R12.2 U2.5
INR_RF: C11.2 C14.2 R13.2 R14.2
JTRST: D12.2 D12.9 P3.6 U6.162
LDO3V3_EN: R48.2 R50.1 U10.5
LDO3V3_SNS: R49.1 R51.2 U10.2 | length 7.8
  Top Layer w0.254: v1(291,246.5) R49.1@292.245,246.5 R51.2@292.245,244.75 ; U10.2@292.2,249.175 292.244,249.219 292.992,249.219 293.023,249.25 v1(293.25,249.25)
  Bottom Layer w0.254: v1(291,246.5) 293.25,248.75 v1(293.25,249.25)
LDO5V_EN: R45.2 R46.1 U7.3 | length 3.6
  Top Layer w0.254: R45.2@269.755,230.75 R46.1@269.755,232.25 270.605,233.1 U7.3@271.5,233.1
LDO5V_FB: R43.2 R44.1 U7.4 | length 3.6
  Top Layer w0.254: U7.4@273.731,233.1 274.645,233.1 R44.1@275.495,232.25 R43.2@275.495,230.75
MCU_VBAT: C53.1 U6.6
MCU_VCAP: C51.1 C52.1 U6.81 U6.125
MCU_VDDA: C49.1 C50.1 FB2.2 R87.2 U6.39
NetC16_1: C16.1 R15.1 R16.2 R53.2 R55.2 | length 13.7
  Top Layer w0.254: R53.2@281.5,282.495 281.5,281.5 282,281 283,281 283.65,280.35 ; C16.1@283.65,278.75 C16.1@283.65,279.083 ; R55.2@287.25,282.495 285.755,281 284.3,281 283.65,280.35 ; R15.1@287.5,279.505 R16.2@285.75,279.505 284.072,279.505 C16.1@283.65,279.083 ; C16.1@283.65,279.083 283.65,280.35
NetC17_2: C17.2 R17.2 | length 1.5
  Top Layer w0.254: C17.2@140.65,328.7 140.653,328.697 140.653,327.203 R17.2@140.655,327.2
NetC25_2: C25.2 R25.2 | length 1.5
  Top Layer w0.254: C25.2@140.25,298.2 140.252,298.197 140.252,296.703 R25.2@140.255,296.7
NetC28_2: C28.2 R26.1 R31.1 U8.1 | length 5.8
  Top Layer w0.254: C28.2@140.25,295.2 C28.2@140.252,295.197 ; U8.1@140.35,291.675 140.346,291.675 140.255,291.766 R26.1@140.255,293.7 140.252,293.703 C28.2@140.252,295.197 ; R31.1@142.5,295.195 142.498,295.197 C28.2@140.252,295.197
NetJ6_A5: J6.A5 R76.1
NetJ6_B5: J6.B5 R77.1
NetP2_2: P2.2 R79.1
NetR11_2: R11.2 U2.1 U2.2
NetR87_1: R87.1 U6.38
NRST: C100.1 D10.5 D10.6 P3.4 R88.2 SW1.1 SW1.2 U6.31
OSC_IN: C80.1 U6.29 Y1.3 | length 6.6
  Top Layer w0.15: Y1.3@149.275,201.475 149.525,201.225 C80.1@150.6,201.225 ; C80.1@150.675,201.225 C80.1@150.6,201.225 ; U6.29@154.85,199.95 151.25,199.95 150.6,200.6 C80.1@150.6,201.225
OSC_OUT: R62.1 U6.30 | length 4.7
  Top Layer w0.15: R62.1@150.3,199.2 152.15,199.2 152.4,199.45 U6.30@154.85,199.45
OSC_OUT_RES: C96.2 R62.2 Y1.1 | length 2.6
  Top Layer w0.15: Y1.1@147.925,200.425 148.075,200.275 C96.2@148.075,199.2 R62.2@149.4,199.2
OUTL_BIAS: C21.1 R19.1 R21.1 | length 4.5
  Top Layer w0.254: C21.1@146.4,330.95 146.402,330.948 148.898,330.948 R19.1@148.9,330.945 R21.1@148.9,328.955
OUTL_BUF_FB: C20.1 R17.1 R18.2 U4.2 | length 6.9
  Top Layer w0.254: R17.1@139.145,327.2 139.147,327.198 139.147,325.703 C20.1@139.15,325.7 139.147,325.698 139.147,324.203 R18.2@139.145,324.2 139.145,322.148 139.73,321.563 140.712,321.563 U4.2@140.75,321.525
OUTL_BUF_IN: C23.2 R20.2 U4.3 | length 11.3
  Top Layer w0.254: U4.3@140.75,320.875 140.712,320.837 139.73,320.837 139.1,320.207 139.1,317.3 140,316.4 141.7,316.4 142.1,316.8 142.1,317.645 R20.2@142.155,317.7 C23.2@144.15,317.7
OUTL_BUF_OUT: C20.2 R18.1 R23.1 U4.1 | length 5.8
  Top Layer w0.254: C20.2@140.65,325.7 C20.2@140.653,325.697 ; U4.1@140.75,322.175 140.746,322.175 140.655,322.266 R18.1@140.655,324.2 140.653,324.203 C20.2@140.653,325.697 ; R23.1@142.9,325.695 142.898,325.697 C20.2@140.653,325.697
OUTL_FILT_OUT: C19.2 R20.1 U4.6 U4.7 | length 15.8
  Top Layer w0.254: R20.1@140.645,317.7 140.645,318.645 141.1,319.1 142.1,319.1 143.1,320.1 143.1,321.1 143.525,321.525 U4.7@145.05,321.525 147.025,321.525 147.1,321.6 ; U4.6@145.05,320.875 146.775,320.875 147.1,321.2 147.1,321.6 ; C19.2@148.9,324.45 148.25,324.45 147.1,323.3 147.1,321.6
OUTL_FILT_RC1: C19.1 R21.2 R22.1 | length 6.9
  Top Layer w0.254: R22.1@148.9,322.455 148.945,322.5 149.8,322.5 150.1,322.8 150.1,325.5 149.65,325.95 C19.1@148.9,325.95 R21.2@148.9,327.445
OUTL_FILT_RC2: C24.2 R22.2 U4.5 | length 5.4
  Top Layer w0.254: U4.5@145.05,320.225 148.872,320.225 148.9,320.198 ; C24.2@148.9,319.45 148.9,320.198 ; R22.2@148.9,320.945 148.9,320.198
OUTL_RC: C22.1 R23.2 | length 5.2
  Top Layer w0.254: C22.1@140.65,330.7 142,330.7 142.9,329.8 R23.2@142.9,327.205
OUTR_BIAS: C29.1 R27.1 R29.1 | length 4.5
  Top Layer w0.254: C29.1@146,300.45 146.002,300.448 148.497,300.448 R27.1@148.5,300.445 R29.1@148.5,298.455
OUTR_BUF_FB: C28.1 R25.1 R26.2 U8.2 | length 6.6
  Top Layer w0.254: R25.1@138.745,296.7 138.747,296.698 138.747,295.203 C28.1@138.75,295.2 138.747,295.198 138.747,293.703 R26.2@138.745,293.7 138.745,291.455 139.063,291.138 U8.2@140.012,291.138
OUTR_BUF_IN: C31.2 R28.2 U8.3 | length 11.3
  Top Layer w0.254: U8.3@140.012,290.488 138.987,290.488 138.7,290.2 138.7,286.8 139.6,285.9 141.3,285.9 141.7,286.3 141.7,287.145 R28.2@141.755,287.2 C31.2@143.75,287.2
OUTR_FILT_OUT: C27.2 R28.1 U8.6 U8.7 | length 15.3
  Top Layer w0.254: R28.1@140.245,287.2 140.245,288.145 140.7,288.6 142.8,288.6 143.9,289.7 143.9,290.6 144.437,291.138 U8.7@145.812,291.138 147.137,291.138 147.2,291.2 ; U8.6@145.812,290.488 146.987,290.488 147.2,290.7 147.2,291.2 ; C27.2@148.5,293.95 148.418,293.868 147.868,293.868 147.2,293.2 147.2,291.2
OUTR_FILT_RC1: C27.1 R29.2 R30.1 | length 6.9
  Top Layer w0.254: R30.1@148.5,291.955 148.545,292 149.4,292 149.7,292.3 149.7,295 149.25,295.45 C27.1@148.5,295.45 R29.2@148.5,296.945
OUTR_FILT_RC2: C32.2 R30.2 U8.5 | length 4.2
  Top Layer w0.254: U8.5@145.812,289.838 147.162,289.838 147.275,289.725 148.472,289.725 148.5,289.698 ; C32.2@148.5,288.95 148.5,289.698 ; R30.2@148.5,290.445 148.5,289.698
OUTR_RC: C30.1 R31.2 | length 5.2
  Top Layer w0.254: C30.1@140.25,300.2 141.6,300.2 142.5,299.3 R31.2@142.5,296.705
PEDAL_MODE_SELECT: P5.5 U6.56
PEDAL_MUTE: P5.3 U6.54
PEDAL_ON/OFF: P5.4 U6.55
PITCH_DOWN: P5.2 U6.53
PITCH_UP: P5.1 U6.52
QSPI_CLK: R71.2 U13.6
QSPI_CS: R34.1 R86.1 U13.1
QSPI_IO0: R68.2 U13.5
QSPI_IO1: R70.2 U13.2
QSPI_IO2: R66.2 U13.3
QSPI_IO3: R64.2 U13.7
RAM_A0: U6.16 U12.25
RAM_A1: U6.17 U12.26
RAM_A2: U6.18 U12.27
RAM_A3: U6.19 U12.60 | length 8.1
  Top Layer w0.15: U12.60@59.814,99.505 62.595,99.505 63.5,98.6 65.9,98.6 66.2,98.3 67.4,98.3
RAM_A4: U6.20 U12.61 | length 7.9
  Top Layer w0.15: U12.61@59.814,100.005 63.395,100.005 64.1,99.3 67.4,99.3
RAM_A5: U6.21 U12.62 | length 4.8
  Top Layer w0.15: U12.62@59.814,100.505 63.995,100.505 64.4,100.1
RAM_A6: U6.60 U12.63 | length 2
  Top Layer w0.15: U12.63@59.814,101.005 61.805,101.005
RAM_A7: U6.63 U12.64 | length 5.1
  Top Layer w0.15: U12.64@59.814,101.505 63.605,101.505 64.5,102.4
RAM_A8: U6.64 U12.65 | length 4.8
  Top Layer w0.15: U12.65@59.814,102.005 62.905,102.005 64.1,103.2
RAM_A9: U6.65 U12.66 | length 4.2
  Top Layer w0.15: U12.66@59.814,102.505 62.005,102.505 63.4,103.9
RAM_A10: U6.66 U12.24
RAM_A11: U6.67 U12.21
RAM_BA0: U6.108 U12.22
RAM_BA1: U6.109 U12.23
RAM_CKE: U6.84 U12.67 | length 2.8
  Top Layer w0.15: U12.67@59.814,103.005 61.105,103.005 62.15,104.05
RAM_CLK: U6.112 U12.68 | length 4.2
  Top Layer w0.15: U12.68@59.814,103.505 59.889,103.58 60.58,103.58 62,105 63.398,105
RAM_D0: U6.104 U12.2 | length 2.8
  Top Layer w0.15: U12.2@48.389,112.005 48.464,112.08 49.18,112.08 50.6,113.5
RAM_D1: U6.105 U12.4 | length 5.8
  Top Layer w0.15: U12.4@48.389,111.005 49.205,111.005 52.7,114.5
RAM_D2: U6.142 U12.5 | length 5.8
  Top Layer w0.15: U12.5@48.389,110.505 49.205,110.505 52.7,114
RAM_D3: U6.143 U12.7 | length 5.8
  Top Layer w0.15: U12.7@48.389,109.505 49.205,109.505 52.7,113
RAM_D4: U6.68 U12.8 | length 5.8
  Top Layer w0.15: U12.8@48.389,109.005 49.205,109.005 52.7,112.5
RAM_D5: U6.69 U12.10 | length 5.8
  Top Layer w0.15: U12.10@48.389,108.005 49.205,108.005 52.7,111.5
RAM_D6: U6.70 U12.11 | length 5.8
  Top Layer w0.15: U12.11@48.389,107.505 49.205,107.505 52.7,111
RAM_D7: U6.73 U12.13 | length 5.8
  Top Layer w0.15: U12.13@48.389,106.505 49.205,106.505 52.7,110
RAM_D8: U6.74 U12.74 | length 4.2
  Top Layer w0.15: U12.74@59.814,106.505 61.805,106.505 63.4,108.1
RAM_D9: U6.75 U12.76 | length 5.8
  Top Layer w0.15: 55.504,111 58.999,107.505 U12.76@59.814,107.505
RAM_D10: U6.76 U12.77 | length 5.8
  Top Layer w0.15: 55.504,111.5 58.999,108.005 U12.77@59.814,108.005
RAM_D11: U6.77 U12.79 | length 5.9
  Top Layer w0.15: U12.79@59.814,109.005 62.805,109.005 63.4,109.6 65.5,109.6
RAM_D12: U6.78 U12.80 | length 6.2
  Top Layer w0.15: U12.80@59.814,109.505 61.805,109.505 62.8,110.5 65.6,110.5
RAM_D13: U6.96 U12.82 | length 5.8
  Top Layer w0.15: 55.504,114 58.999,110.505 U12.82@59.814,110.505
RAM_D14: U6.97 U12.83 | length 5.8
  Top Layer w0.15: 55.504,114.5 58.999,111.005 U12.83@59.814,111.005
RAM_D15: U6.98 U12.85 | length 5.8
  Top Layer w0.15: U12.85@59.814,112.005 65.605,112.005
RAM_D16: U6.85 U12.31 | length 5.8
  Top Layer w0.15: U12.31@48.389,97.505 49.205,97.505 52.7,101
RAM_D17: U6.86 U12.33
RAM_D18: U6.87 U12.34
RAM_D19: U6.88 U12.36 | length 5.8
  Top Layer w0.15: U12.36@48.389,95.005 49.205,95.005 52.7,98.5
RAM_D20: U6.89 U12.37 | length 5.8
  Top Layer w0.15: U12.37@48.389,94.505 49.205,94.505 52.7,98
RAM_D21: U6.128 U12.39 | length 5.8
  Top Layer w0.15: U12.39@48.389,93.505 49.205,93.505 52.7,97
RAM_D22: U6.129 U12.40 | length 5.8
  Top Layer w0.15: U12.40@48.389,93.005 49.205,93.005 52.7,96.5
RAM_D23: U6.130 U12.42 | length 5.8
  Top Layer w0.15: U12.42@48.389,92.005 49.205,92.005 52.7,95.5
RAM_D24: U6.131 U12.45 | length 11.8
  Top Layer w0.15: U12.45@59.814,92.005 59.889,91.93 60.47,91.93 61.5,90.9 68.6,90.9 70.409,92.709
RAM_D25: U6.132 U12.47 | length 11
  Top Layer w0.15: U12.47@59.814,93.005 59.889,92.93 60.47,92.93 61.5,91.9 68.2,91.9 69.709,93.409
RAM_D26: U6.133 U12.48 | length 10
  Top Layer w0.15: U12.48@59.814,93.505 60.895,93.505 61.7,92.7 67.6,92.7 68.909,94.009
RAM_D27: U6.134 U12.50 | length 5.8
  Top Layer w0.15: 55.504,98 58.999,94.505 U12.50@59.814,94.505
RAM_D28: U6.175 U12.51 | length 5.8
  Top Layer w0.15: 55.504,98.5 58.999,95.005 U12.51@59.814,95.005
RAM_D29: U6.176 U12.53 | length 8.4
  Top Layer w0.15: U12.53@59.814,96.005 60.595,96.005 60.8,95.8 61.8,95.8 62,96 64,96 65.2,94.8 67.5,94.8
RAM_D30: U6.11 U12.54 | length 8.3
  Top Layer w0.15: U12.54@59.814,96.505 60.705,96.505 60.9,96.7 61.9,96.7 62.1,96.9 64.7,96.9 65.7,95.9 67.5,95.9
RAM_D31: U6.12 U12.56 | length 5.8
  Top Layer w0.15: 55.504,101 58.999,97.505 U12.56@59.814,97.505
RAM_DM0: U6.169 U12.16 | length 5.8
  Top Layer w0.15: U12.16@48.389,105.005 49.205,105.005 52.7,108.5
RAM_DM1: U6.170 U12.71 | length 4.9
  Top Layer w0.15: U12.71@59.814,105.005 60.605,105.005 61.4,105.8 62.4,105.8 63.8,107.2
RAM_DM2: U6.173 U12.28
RAM_DM3: U6.174 U12.59 | length 8.6
  Top Layer w0.15: U12.59@59.814,99.005 60.795,99.005 60.9,98.9 62,98.9 63.2,97.7 65.5,97.7 66.2,97 67.6,97
RAM_NCAS: U6.160 U12.18
RAM_NCS: U6.83 U12.20
RAM_NRAS: U6.59 U12.19
RAM_NWE: U6.32 U12.17
SAI_FS_A: R83.2 U11.4 | length 6.7
  Top Layer w0.15: 162.9,249.7 162.9,252.021 165.324,254.444 165.324,255.349 U11.4@165.375,255.4
SAI_MCLK_A: R82.2 U11.3 | length 7.4
  Top Layer w0.15: 161.3,249.8 161.3,252 163.5,254.2 164.166,254.2 164.598,254.632 164.598,255.273 U11.3@164.725,255.4
SAI_SCK_A: R84.2 U11.5 | length 6.4
  Top Layer w0.15: 164.5,249.6 164.5,252 165.5,253 165.5,253.7 166.025,254.225 U11.5@166.025,255.4
SAI_SD_A: R85.2 U11.7 | length 6.1
  Top Layer w0.15: 167,249.6 167,250.5 167.4,250.9 167.4,252.5 167.2,252.7 167.2,253.5 167.325,253.625 U11.7@167.325,255.4
SAI_SD_B: R60.1 U6.2 | length 2.8
  Top Layer w0.15: 165.7,249.7 165.7,251 166.4,251.7 R60.1@166.4,252.25
STM_CODEC_RST: R59.1 U6.9
STM_I2C1_SCL: R61.2 U6.164
STM_I2C1_SDA: R63.2 U6.165
STM_I2C2_SCL: R90.2 U6.45
STM_I2C2_SDA: R91.2 U6.46
STM_QSPI_CLK: R71.1 U6.58
STM_QSPI_CS: R86.2 U6.79
STM_QSPI_IO0: R68.1 U6.26
STM_QSPI_IO1: R70.1 U6.27
STM_QSPI_IO2: R66.1 U6.25
STM_QSPI_IO3: R64.1 U6.24
STM_SAI_FS_A: R83.1 U6.3
STM_SAI_MCLK_A: R82.1 U6.1
STM_SAI_SCK_A: R84.1 U6.4
STM_SAI_SD_A: R85.1 U6.5
SWCLK/TCK: D10.2 D10.9 P3.2 U6.137
SWDIO/TMS: D10.1 D10.10 P3.1 U6.124
SWO/TDO: D10.4 D10.7 P3.3 U6.161
TDI: D12.1 D12.10 P3.5 U6.138
USART6_RX: R75.1 U6.116
USART6_TX: R35.1 U6.115
USART_RX: P1.1 R75.2
USART_TX: P1.3 R35.2
USB_CON_DM: D9.6 J6.A7 J6.B7
USB_CON_DP: D9.4 J6.A6 J6.B6
USB_DM: D9.1 R40.1
USB_DP: D9.3 R41.1
USB_OTG_FS_DM: R40.2 U6.122
USB_OTG_FS_DP: R41.2 U6.123
USB_OTG_FS_VBUS: C99.1 R80.2 R81.1 U6.120
VB_REF1: R53.1 U3.3 U3.5 | length 7.4
  Top Layer w0.254: R53.1@281.5,284.005 281.512,284.017 281.512,286.837 U3.5@281.525,286.85 281.525,288.875 282.175,289.525 U3.3@282.175,291.15
VB_REF2: R55.1 U5.3 U5.5 | length 8.3
  Top Layer w0.254: R55.1@287.25,284.005 287.487,284.242 287.487,286.062 U5.5@287.525,286.1 287.525,288.675 288.175,289.325 U5.3@288.175,291.9
VBL1: R52.2 U3.1 U3.2 | length 5.2
  Top Layer w0.254: U3.2@282.825,291.15 282.825,292.475 283.047,292.697 283.488,292.697 ; U3.1@283.475,291.15 283.488,291.162 283.488,292.697 ; R52.2@283.5,294.245 283.488,294.233 283.488,292.697
VBL2: R54.2 U5.1 U5.2 | length 4.1
  Top Layer w0.254: U5.2@288.825,291.9 288.863,291.938 288.863,292.913 289.023,293.072 289.487,293.072 ; U5.1@289.475,291.9 289.487,291.912 289.487,293.072 ; R54.2@289.5,294.245 289.487,294.233 289.487,293.072
VBR1: R56.2 U3.6 U3.7 | length 5.1
  Top Layer w0.254: U3.6@282.175,286.85 282.175,285.599 282.324,285.45 282.8,285.45 282.825,285.425 ; U3.7@282.825,286.85 282.825,285.425 ; R56.2@283.5,284.005 283.5,284.75 282.825,285.425
VBR2: R57.2 U5.6 U5.7 | length 3.9
  Top Layer w0.254: U5.6@288.175,286.1 288.213,286.062 288.213,285.237 288.462,284.987 288.863,284.987 ; U5.7@288.825,286.1 288.863,286.062 288.863,284.987 ; R57.2@289.25,284.005 289.108,284.147 289.108,284.742 288.863,284.987
VCOM: C62.1 C63.1 R33.1 R58.1 R94.2 R95.2 R96.2 R97.2 U11.15 | length 10.5
  Top Layer w0.4: U11.15@171.875,261.2 172.5,261.2 172.8,261.5 173.375,261.5 C62.1@173.4,261.525 ; C62.1@173.475,261.525 C62.1@173.4,261.525 ; C63.1@174.9,261.65 174.8,261.55 173.425,261.55 C62.1@173.4,261.525
  Bottom Layer w0.15: R97.2@164.1,261.75 R96.2@166.1,261.75 R95.2@169.3,261.75 R94.2@171.3,261.75
pads on no net: D12.5 D12.6 J1.1 J1.2 J1.4 J1.5 J1.6 J2.1 J2.2 J2.4 J2.5 J2.6 J3.1 J3.2 J3.4 J3.5 J3.6 J4.1 J4.2 J4.4 J4.5 J4.6 J6. J6.A8 J6.B8 P3.12 U6.7 U6.8 U6.10 U6.13 U6.28 U6.33 U6.34 U6.35 U6.40 U6.41 U6.42 U6.43 U6.44 U6.47 U6.50 U6.51 U6.57 U6.80 U6.99 U6.100 U6.101 U6.106 U6.107 U6.110 U6.111 U6.117 U6.118 U6.119 U6.121 U6.139 U6.140 U6.141 U6.144 U6.145 U6.146 U6.147 U6.150 U6.151 U6.152 U6.153 U6.154 U6.155 U6.156 U6.157 U6.163 U6.167 U6.168 U6.171 U10.3 U10.7 U11.1 U11.23 U11.28 U12.14 U12.30 U12.57 U12.69 U12.70 U12.73